# Altium PCB CH32M007E8R_FAN_R0.PcbDoc
Units mil, origin at the board's own origin, x right, y up, seen from the top; angles counter-clockwise.
Board outline 2118.97 x 1187.04 mil, 2 copper layers (Top Layer, Bottom Layer); 47 components, 34 nets, 143 pads, 76 vias.
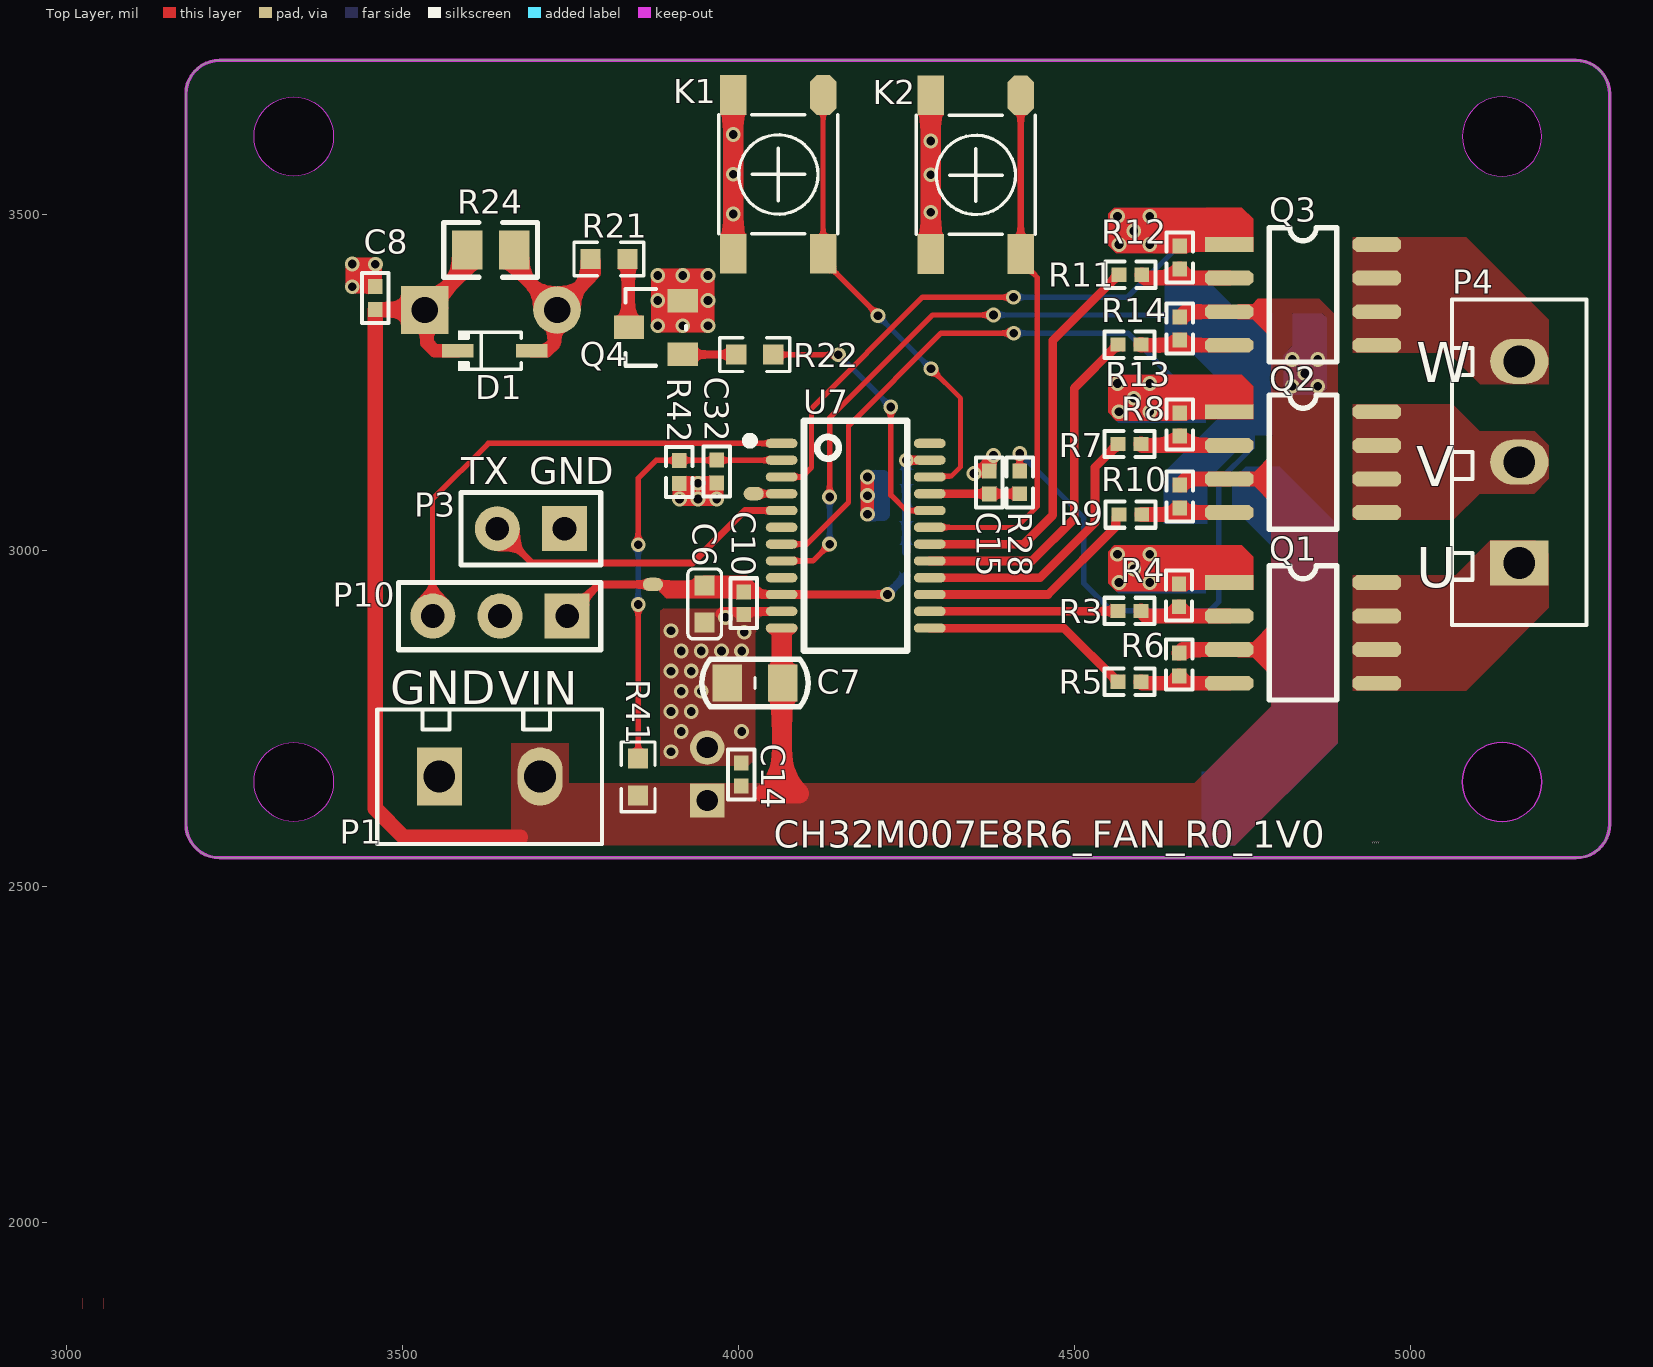
[diagram p0: Top Layer view]
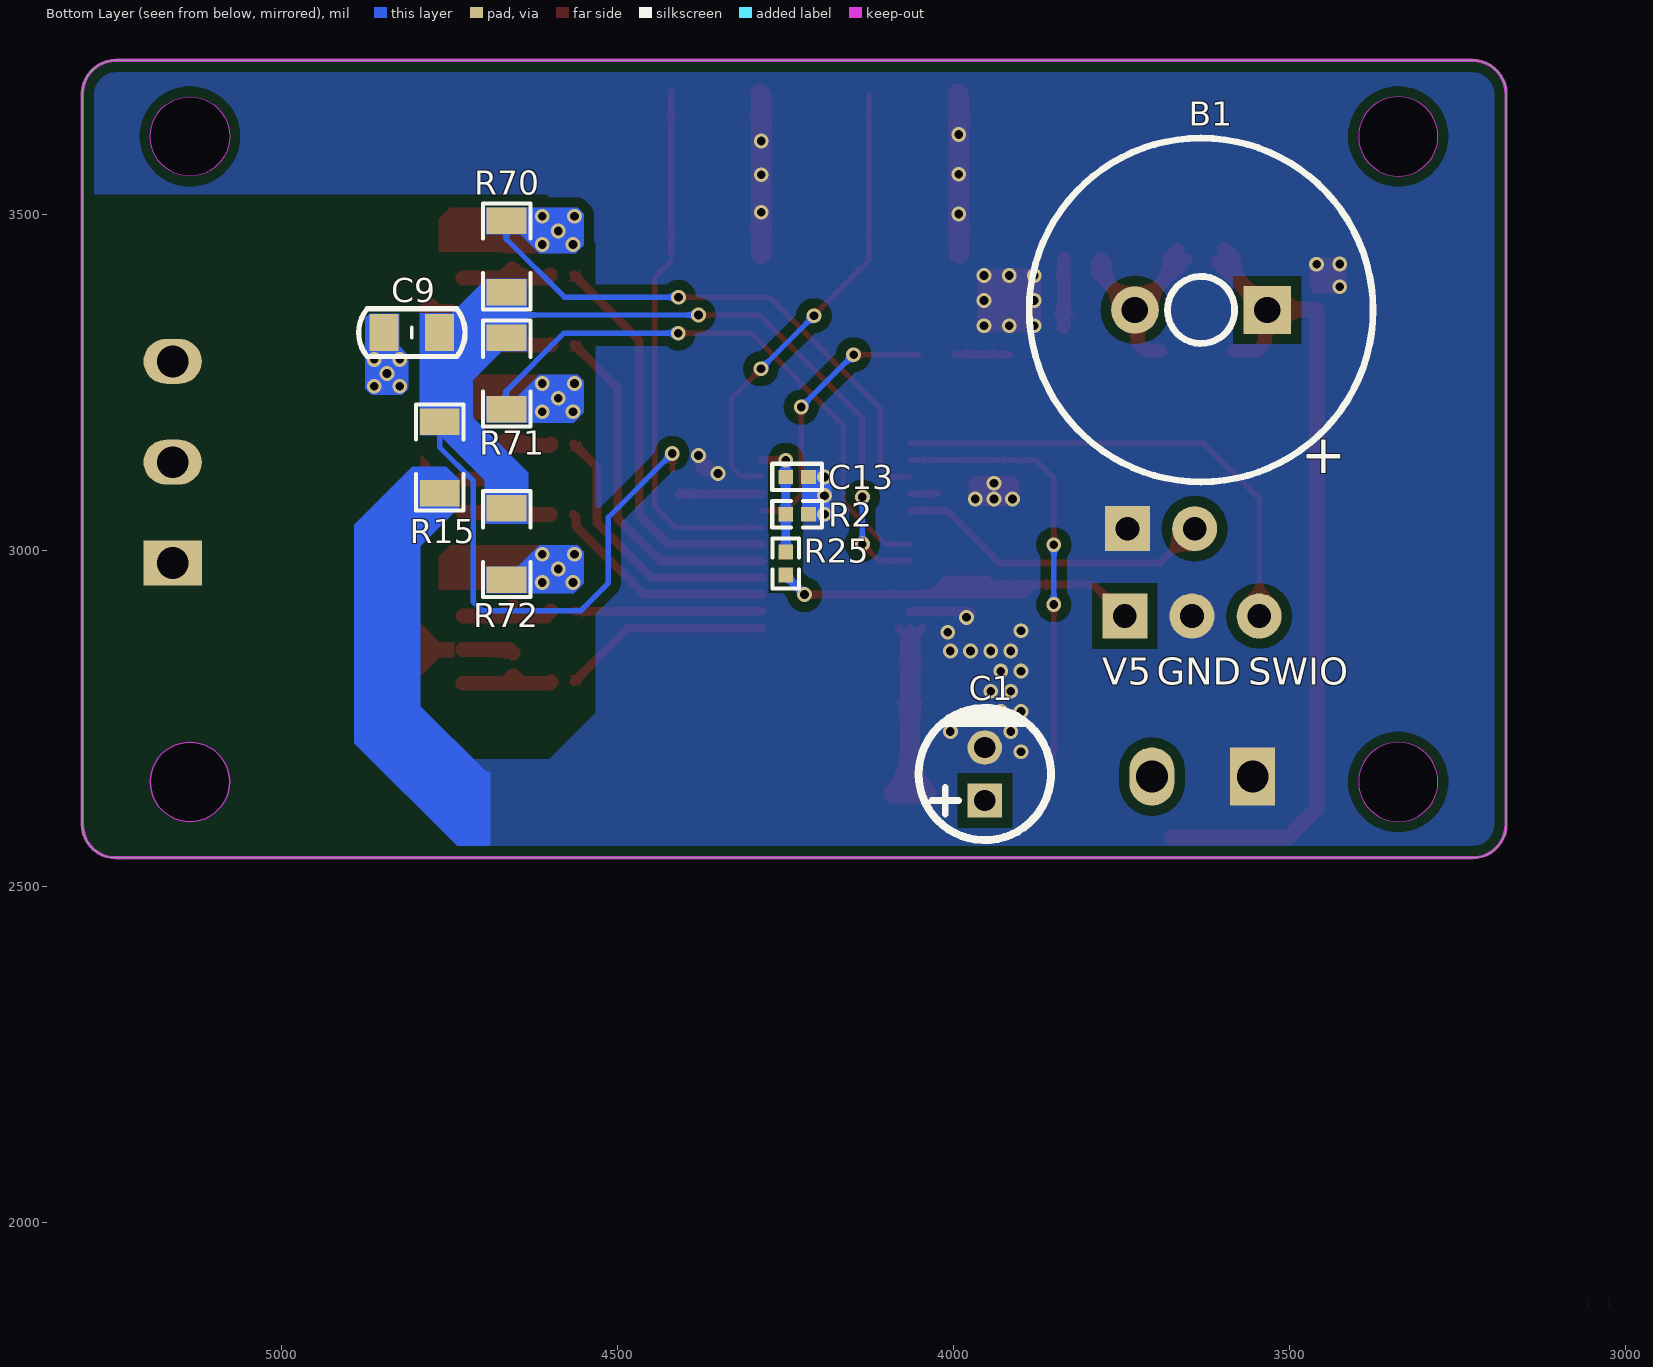
[diagram p1: Bottom Layer view, seen from below]

## Layer stack, top to bottom
Top Solder: solder mask 0.4, Solder Resist, Dk 3.5
Top Layer: signal copper 1.4
Dielectric1: dielectric 12.6, FR-4, Dk 4.8
Bottom Layer: signal copper 1.4
Bottom Solder: solder mask 0.4, Solder Resist, Dk 3.5

## Board outline
3177.96,2592 3177.96,3679.04 cw(c3227.96,3679.04) 3227.96,3729.04 5246.92,3729.04 cw(c5246.92,3679.04) 5296.92,3679.04 5296.92,2592 cw(c5246.92,2592) 5246.92,2542 3227.96,2542 cw(c3227.96,2592)
cut-out: 5077.81,2655.17 ccw(c5136.86,2655.17) 5136.86,2596.12 ccw(c5136.86,2655.17) 5195.92,2655.17 ccw(c5136.86,2655.17) 5136.86,2714.23 ccw(c5136.86,2655.17)
cut-out: 5077.81,3615.8 ccw(c5136.86,3615.8) 5136.86,3556.75 ccw(c5136.86,3615.8) 5195.92,3615.8 ccw(c5136.86,3615.8) 5136.86,3674.86 ccw(c5136.86,3615.8)
cut-out: 3338.44,2596.12 cw(c3338.44,2655.17) 3279.38,2655.17 cw(c3338.44,2655.17) 3338.44,2714.23 cw(c3338.44,2655.17) 3397.49,2655.17 cw(c3338.44,2655.17)
cut-out: 3338.44,3556.75 cw(c3338.44,3615.8) 3279.38,3615.8 cw(c3338.44,3615.8) 3338.44,3674.86 cw(c3338.44,3615.8) 3397.49,3615.8 cw(c3338.44,3615.8)

## Design rules (kind name [scope] priority, off if disabled: settings)
Clearance Clearance_1 [InPolygon] p1: gap=15 ignorepadtopadclearanceinfootprint=FALSE except(0: Arc-Hole Track-Hole SMDPad-Hole THPad-Hole Via-Hole Fill-Hole Poly-Hole Region-Hole Text-Hole)
Clearance [All] p2: gap=6 ignorepadtopadclearanceinfootprint=FALSE except(0: Arc-Hole Track-Hole SMDPad-Hole THPad-Hole Via-Hole Fill-Hole Poly-Hole Region-Hole Text-Hole)
DiffPairsRouting [All] p1: maxlimit=10 minlimit=10 mostfreqgap=10 toplayer_minwidth=15 toplayer_maxwidth=15 toplayer_prefwidth=15 bottomlayer_minwidth=15 bottomlayer_maxwidth=15 bottomlayer_prefwidth=15 substack1={CB62A223-23CE-4B5D-AA07-581922EC101A} toplayer_{cb62a223-23ce-4b5d-aa07-581922ec101a}_minwidth=15 toplayer_{cb62a223-23ce-4b5d-aa07-581922ec101a}_maxwidth=15 toplayer_{cb62a223-23ce-4b5d-aa07-581922ec101a}_prefwidth=15 bottomlayer_{cb62a223-23ce-4b5d-aa07-581922ec101a}_minwidth=15 bottomlayer_{cb62a223-23ce-4b5d-aa07-581922ec101a}_maxwidth=15 bottomlayer_{cb62a223-23ce-4b5d-aa07-581922ec101a}_prefwidth=15 substack2={A23039D2-CB89-402F-B5AE-C31389269607} toplayer_{a23039d2-cb89-402f-b5ae-c31389269607}_minwidth=15 toplayer_{a23039d2-cb89-402f-b5ae-c31389269607}_maxwidth=15 toplayer_{a23039d2-cb89-402f-b5ae-c31389269607}_prefwidth=15 bottomlayer_{a23039d2-cb89-402f-b5ae-c31389269607}_minwidth=15 bottomlayer_{a23039d2-cb89-402f-b5ae-c31389269607}_maxwidth=15 bottomlayer_{a23039d2-cb89-402f-b5ae-c31389269607}_prefwidth=15 substack3={24D51226-A82C-40CF-B0A6-47B6E82A89C6} toplayer_{24d51226-a82c-40cf-b0a6-47b6e82a89c6}_minwidth=15 toplayer_{24d51226-a82c-40cf-b0a6-47b6e82a89c6}_maxwidth=15 toplayer_{24d51226-a82c-40cf-b0a6-47b6e82a89c6}_prefwidth=15 bottomlayer_{24d51226-a82c-40cf-b0a6-47b6e82a89c6}_minwidth=15 bottomlayer_{24d51226-a82c-40cf-b0a6-47b6e82a89c6}_maxwidth=15 bottomlayer_{24d51226-a82c-40cf-b0a6-47b6e82a89c6}_prefwidth=15 maxuncoupledlength=500
PolygonConnect [All] p1: connectstyle=Direct reliefconductorwidth=10 reliefentries=4 polygonreliefangle="90 Angle" airgapwidth=10
RoutingVias [All] p1: holewidth=13 width=22 viastyle="Through Hole" minholewidth=13 minwidth=22 maxholewidth=28 maxwidth=50
SolderMaskExpansion [All] p1: expansion=4 istentingtop=FALSE
Width [All] p1: maxlimit=100 minlimit=6 preferedwidth=10 substack1={CB62A223-23CE-4B5D-AA07-581922EC101A} substack2={A23039D2-CB89-402F-B5AE-C31389269607} substack3={24D51226-A82C-40CF-B0A6-47B6E82A89C6} minimp=50.000000 maximp=50.000000 favimp=50.000000
29 further rules are at their usual default settings.

## Components (designator, comment, footprint, x,y, rotation, side; value= is the part's Value field where it differs from the comment)
B1 "BUZZER" M_BUZZER12550 3630.93,3358.42 r0 bottom
C1 "47uF/35V" M_C_RB_D5F2 3952,2667 r90 bottom
C6 "10uF" M_C0603 3952,2920 r270 top
C7 "10uF/25V" M_C0805 4028,2803 r180 top
C8 "0.1uF/25V" M_C0402- 3459.52,3376 r90 top
C9 "1uF/50V" M_C0805 4809.52,3323 r180 bottom
C10 "0.1uF" M_C0402- 4008.37,2920.22 r270 top
C13 "0.1uF" M_C0402- 4232.14,3109.37 r180 bottom
C14 "0.1uF/50V" M_C0402- 4004,2667 r90 top
C15 "1nF" M_C0402- 4373.95,3100.11 r270 top
C32 "0.1uF" M_C0402- 3968.37,3116.14 r270 top
D1 "4148" SOD-323 3637.52,3297 r180 top
K1 "KH-6X6X8H-STM" KEY2-SMD 4057.54,3558.59 r270 top
K2 "KH-6X6X8H-STM" KEY2-SMD 4351.48,3558 r270 top
P1 "POWER" WJ15EDGRC3.81-2 3630,2658 r0 top
P3 "TXD" HDR2.54-LI-2P 3741.39,3032 r270 top
P4 "MHDR1X3" WJ15EDGRC3.81-3 5162.52,3131 r90 top
P10 "SWD" HDR2.54-LI-3P 3595.39,2902 r270 top
Q1 "NP4606SR" SOP8 4730.52,2952 r270 top
Q2 "NP4606SR" SOP8 4730.52,3206 r270 top
Q3 "NP4606SR" SOP8 4730.52,3455 r270 top
Q4 "S8050" SOT23 3877.52,3331.48 r90 top
R2 "1k 1%" M_R0402- 4233.78,3052 r0 bottom
R3 "22 Ω" M_R0402- 4581.22,2908.2 r180 top
R4 "20k" M_R0402- 4657.28,2932 r270 top
R5 "22 Ω" M_R0402- 4581.65,2802.63 r180 top
R6 "20k" M_R0402- 4657.52,2829 r270 top
R7 "22 Ω" M_R0402- 4581.65,3156.63 r180 top
R8 "20k" M_R0402- 4658.52,3186 r270 top
R9 "22 Ω" M_R0402- 4582.65,3051.63 r180 top
R10 "20k" M_R0402- 4658.52,3079 r270 top
R11 "22 Ω" M_R0402- 4582.65,3408.63 r180 top
R12 "20k" M_R0402- 4658.52,3435 r270 top
R13 "22 Ω" M_R0402- 4581.65,3304.63 r180 top
R14 "20k" M_R0402- 4658.52,3329 r270 top
R15 "0R100/1W" M_R1206- 4766,3136.85 r90 bottom
R21 "100Ω" M_R0603 3834.52,3434.5 r180 top
R22 "1kΩ" M_R0603 3997.5,3290 r0 top
R24 "2KΩ" M_R0805 3664.52,3447 r180 top
R25 "15k 1%" M_R0402- 4248.63,2979.14 r270 bottom
R28 "10k" M_R0402- 4420.19,3100.18 r270 top
R41 "4.7k 1%" M_R0603 3850,2689.5 r270 top
R42 "1k 1%" M_R0402- 3910.89,3117.43 r90 top
R70 "0R100/1W" M_R1206- 4666.52,3436 r90 bottom
R71 "0R100/1W" M_R1206- 4664.52,3264 r270 bottom
R72 "0R100/1W" M_R1206- 4664.52,3010.3 r270 bottom
U7 "CH32M007E8R6" QSOP24 4064.53,3159 r270 top locked

## Footprints (in the part's own frame and the unit in brackets; to place one, negate y for a bottom-side part, rotate by r counter-clockwise, add the part's x,y. Pads: shape width x height; smd on the part's side, far side on the other; paste and mask are expansions set on the pad)
HDR2.54-LI-2P [mm]
  rect 1.7x1.7 hole 0.9: 1(0,0)
  round 1.7 hole 0.9: 2(0,-2.54)
  silkscreen extent -1.37,-3.91 1.37,1.37, body extent -1.27,-3.81 1.27,1.27, height 8.5
HDR2.54-LI-3P [mm]
  rect 1.7x1.7 hole 0.9: 1(0,3.81)
  round 1.7 hole 0.9: 2(0,1.27) 3(0,-1.27)
  silkscreen extent -1.27,-2.57 1.27,5.08, body extent -1.27,-2.54 1.27,5.08, height 8.5
KEY2-SMD [mm]
  oct 1.5x1 smd: 1(-3.023,1.749)
  rect 1.5x1 smd: 2(2.977,1.749) 3(-3.023,-1.651) 4(2.977,-1.651)
  silkscreen extent -2.27,-2.2 2.23,2.3, body extent -3.21,-2.55 3.19,2.65, height 1.5
M_BUZZER12550 [mm]
  rect 1.8x1.8 hole 1: 1(-2.477,0.023)
  round 1.8 hole 1: 2(2.523,0.023)
  silkscreen extent -6.48,-6.48 6.52,6.52
M_C0402- [mm]
  rect 0.566x0.54 smd mask+0.051: 1(-0.454,-0.009) 2(0.412,-0.009)
  silkscreen extent -0.97,-0.51 0.92,0.49
M_C0603 [mil]
  rect 30x30 smd: 1(-27.5,-2) 2(27.5,-2)
  silkscreen extent -52,-27 52,23
M_C0805 [mm]
  rect 1.1x1.4 smd: 1(-0.972,0.019) 2(1.128,0.019)
  silkscreen extent -1.93,-0.88 2.09,0.92
M_C_RB_D5F2 [mm]
  rect 1.3x1.3 hole 0.8: 1(-1.005,0.045)
  round 1.3 hole 0.8: 2(0.995,0.045)
  silkscreen extent -2.5,-2.45 2.49,2.55
M_R0402- [mm]
  rect 0.566x0.54 smd mask+0.051: 1(-0.454,-0.035) 2(0.412,-0.035)
  silkscreen extent -0.97,-0.53 0.92,0.46
M_R0603 [mil]
  rect 30x30 smd: 1(-0.5,1) 2(54.5,1)
  silkscreen extent -25,-24 79,26
M_R0805 [mm]
  rect 1.16x1.47 smd: 1(-0.051,0) 2(1.729,0)
  silkscreen extent -0.93,-1.04 2.61,1.03
M_R1206- [mm]
  rect 1x1.5 smd: 1(-1.325,-0.025) 2(1.375,-0.025)
  silkscreen extent -1.97,-0.93 2.03,0.87
QSOP24 [mm]
  oval 0.35x1.2 smd mask+0.051: 1(0,0) 2(0.635,0) 3(1.27,0) 4(1.905,0) 5(2.54,0) 6(3.175,0) 7(3.81,0) 8(4.445,0) 9(5.08,0) 10(5.715,0) 11(6.35,0) 12(6.985,0) 13(6.985,5.6) 14(6.35,5.6) 15(5.715,5.6) 16(5.08,5.6) 17(4.445,5.6) 18(3.81,5.6) 19(3.175,5.6) 20(2.54,5.6) 21(1.905,5.6) 22(1.27,5.6) 23(0.635,5.6) 24(0,5.6)
  silkscreen extent -0.86,-1.35 7.84,4.75
SOD-323 [mil]
  rect 47.24x20 smd: 1(-55,0) 2(55,0)
  silkscreen extent -39,-30 55,30
SOP8 [mil]
  rect 22x72 smd: 1(0,0)
  oct 22x72 smd: 2(50,0) 3(100,0) 4(150,0) 5(150,220) 6(100,220) 7(50,220) 8(0,220)
  silkscreen extent -25,60 175,160, body extent -24,-8 174,230, height 63
SOT23 [mil]
  rect 35x45 smd: 1(-40,-40) 2(40,-40) 3(0,40)
  silkscreen extent -57,-45 57,45
WJ15EDGRC3.81-2 [mm]
  rect 1.7x2.2 hole 1.2: 1(-1.905,0.127)
  oval 1.7x2.2 hole 1.2: 2(1.905,0.127)
  silkscreen extent -4.25,-2.41 4.25,2.67
WJ15EDGRC3.81-3 [mm]
  rect 1.7x2.2 hole 1.2: 1(-3.81,0)
  oval 1.7x2.2 hole 1.2: 2(0,0) 3(3.81,0)
  silkscreen extent -6.15,-2.54 6.15,2.54

## Part data
C1: library part "CAPACITOR POL_2", "Capacitor"
C6 C7 C8 C9 C10 C13 C14 C15 C32: library part "Cap Semi", "Capacitor (Semiconductor SIM Model)", LatestRevisionDate=17-Jul-2002, LatestRevisionNote="Re-released for DXP Platform.", PackageReference=C0805, Published=8-Jun-2000, Publisher="Altium Limited"
D1: library part "Diode 1N4148", "High Conductance Fast Diode", Code_JEDEC=DO-204-AH, ComponentLink1Description="Manufacturer Link", ComponentLink1URL=http://www.fairchildsemi.com/, ComponentLink2Description=Datasheet, ComponentLink2URL=http://www.fairchildsemi.com/ds/1N%2F1N4148.pdf, DatasheetDocument=1997, LatestRevisionDate=17-Jul-2002, LatestRevisionNote="Re-released for DXP Platform.", PackageReference=DO-35, Published=8-Jun-2000, Publisher="Altium Limited"
K1 K2: Contact Current=50mA, IP Rating=-, JLCPCB Part Class="Extended Part", Voltage Rating (DC)=12V, Add into BOM=yes, Convert to PCB=yes, Datasheet=https://atta.szlcsc.com/upload/public/pdf/source/20210608/C2837534_94EAC7D8AFBB996E2814FACF50FEEF85.pdf, Device=KH-6X6X8H-STM, LCSC Part Name=KH-6X6X8H-STM, Manufacturer Part=KH-6X6X8H-STM, Mechanical Life=80000, Name==''Part, Operating Force=-, Operating Temperature=-, Power Rating=-, Supplier=LCSC, Supplier Footprint=SMD, Supplier Part=C2837534, Switch Height=-, Switch Length=6mm, Switch Width=6mm, Symbol=KH-6X6X8H-STM, Voltage Rating (AC)=-, With Lamp=-
P1 P3: library part 2PIN
P4: "Header, 3-Pin", LatestRevisionDate=17-Jul-2002, LatestRevisionNote="Re-released for DXP Platform.", Publisher="Altium Limited"
P10: library part 3PIN
Q1 Q2 Q3: library part NP9926BSR-G, Continuous Drain Current (Id)=6A, Drain Source Voltage (Vdss)=20V, Gate Threshold Voltage (Vgs(th)@Id)=700mV@250uA, Input Capacitance (Ciss@Vds)=900pF@10V, JLCPCB Part Class="Extended Part", Power Dissipation (Pd)=1.25W, Reverse Transfer Capacitance (Crss@Vds)=100pF@10V, Add into BOM=yes, Convert to PCB=yes, Datasheet=https://atta.szlcsc.com/upload/public/pdf/source/20220426/45EDAE8AA532D945771DBC41E7CE2370.pdf, Device=NP9926BSR-G, Manufacturer Part=NP9926BSR-G, Supplier=LCSC, Supplier Footprint=SOP-8, Supplier Part=C2991134, Symbol=NP9926BSR-G, Total Gate Charge (Qg@Vgs)=12nC@4.5V
Q4: library part NPN1
R2 R3 R4 R5 R6 R7 R8 R9 R10 R11 R12 R13 R14 R15 R21 R22 R24 R25 R28 R41 R42 R70 R71 R72: library part Res2, "Resistor", LatestRevisionDate=17-Jul-2002, LatestRevisionNote="Re-released for DXP Platform.", PackageReference=AXIAL-0.4, Published=8-Jun-2000, Publisher="Altium Limited"
U7: "RISC-V MCU, 48MHz, OPA/CMP/UART/I2C, 24V P/NMOS gate driver for motor"

## Free pads (board coordinates)
  oval 30x20 smd: 2(3873,2949) 2(4023,3084)

## Via types
v1: diameter 22, hole 13, Top Layer to Bottom Layer, tented both sides, 76 vias

## Nets (pads, with @x,y where several pads share a name; then routed paths per layer and width w, separated by ;. In a path a pad name is that pad's centre, name@x,y a point inside that pad or via, vN(x,y) a via of type N, cw(c..) or ccw(c..) an arc to the next point about the centre after c; other vN are vias at no path point)
ADC_Vbus: C32.1 R41.1 R42.2 U7.2 | length 641.7
  Top Layer w8: R41.1 v1(3851,2919) ; v1(3851,3008) 3851,3107 3877.65,3133.65 R42.2 3912.43,3133.82 4064.35,3133.82 U7.2
  Bottom Layer w8: v1(3851,2919) v1(3851,3008)
BEEP_CTRL: R22.2 U7.20 | length 405.8
  Top Layer w8: R22.2 v1(4149,3291) ; v1(4227,3213) 4227,3082 4250,3059 U7.20
  Bottom Layer w8: v1(4149,3291) v1(4227,3213)
CMP1_N0: C15.2 R28.2 U7.21 | length 123.7
  Top Layer w13: U7.21 4285.11,3083.89 4352.63,3083.89 4408.52,3083.89 R28.2@4408.63,3083.78
CMP1_P0: C13.1 R2.2 R25.1 U7.23 | length 172
  Top Layer w13: v1(4250,3133.85) 4284.85,3133.85 U7.23
  Bottom Layer w13: v1@4249.93,3133.93 v1(4250,3133.85) C13.1 R2.2 R25.1
GND: C1.2 C6.2 C7.2 C8.2 C10.2 C13.2 C14.2 C15.1 C32.2 K1.3 K1.4 K2.3 K2.4 P1.1 P3.1 P10.2 Q4.2 R2.1 R15.1 R42.1 U7.11 | length 1955.3
  Top Layer w13: v1@3972.63,2904.78 v1@3972.63,2904.87 ; v1@3972.63,2905.78 3975.7,2908.85 4064.38,2908.85 U7.11 ; v1@4353.72,3115.72 4379,3141 v1(4380,3141) 4380,3138.56 4377.76,3136.32 4377.76,3121.99 4371.49,3115.72 v1@4353.72,3115.72 ; v1@4353.72,3115.72 4352,3114 v1(4351,3114) 4352.72,3115.72 v1@4353.72,3115.72
  Top Layer w20: 3425.55,3409 3459.85,3408.92 ; R42.1 R42.1@3912.43,3099.74 ; C32.2 C32.2@3967.82,3099.74 ; v1(4192.29,3053.37) v1(4192.29,3081.18) v1(4192.29,3109) ; v1(3880.03,3371.48) v1(3880.03,3408.97) 3898.77,3408.97 ; v1(3880.03,3371.48) v1(3880.03,3334) 3898.77,3334 ; v1(3880.03,3371.48) Q4.2@3898.77,3371.48 ; 3898.77,3334 Q4.2@3898.77,3371.48 ; 3898.77,3334 v1(3917.52,3334) ; Q4.2@3898.77,3371.48 3898.77,3408.97 ; Q4.2@3898.77,3371.48 Q4.2 ; 3898.77,3408.97 v1(3917.52,3408.97) ; 3912.43,3087.93 3940.13,3087.93 ; 3912.43,3087.93 R42.1@3912.43,3099.74 ; 3912.43,3087.93 v1(3912.43,3076.11) v1(3940.13,3076.11) ; R42.1@3912.43,3099.74 v1(3940.13,3099.74) ; v1(3917.52,3334) Q4.2 ; v1(3917.52,3334) 3936.26,3334 ; Q4.2 v1(3917.52,3408.97) ; Q4.2 Q4.2@3936.26,3371.48 ; v1(3917.52,3408.97) 3936.26,3408.97 ; 3936.26,3334 Q4.2@3936.26,3371.48 ; 3936.26,3334 v1(3955,3334) v1(3955,3371.48) ; Q4.2@3936.26,3371.48 3936.26,3408.97 ; Q4.2@3936.26,3371.48 v1(3955,3371.48) ; 3936.26,3408.97 v1(3955,3408.97) v1(3955,3371.48) ; v1(3940.13,3076.11) v1(3967.82,3076.11) 3967.82,3087.93 ; v1(3940.13,3076.11) 3940.13,3087.93 ; 3940.13,3087.93 3967.82,3087.93 ; 3940.13,3087.93 v1(3940.13,3099.74) ; v1(3940.13,3099.74) C32.2@3967.82,3099.74 ; 3967.82,3087.93 C32.2@3967.82,3099.74 ; v1(3425.52,3392) C8.2 3459.89,3408.92 v1(3459.89,3425.63) v1(3425.52,3426) 3425.52,3409 v1(3425.52,3392)
  Top Layer w30: K1.4 v1(3992.56,3500.42) v1(3992.56,3559.48) v1(3992.56,3618.53) K1.3 K1.3@3994.54,3679.57 ; K2.4 v1(4286.5,3558.89) K2.3 K2.3@4288.48,3678.98
  Bottom Layer w20: 4192.29,3067.28 4215.92,3067.28 ; 4192.29,3067.28 v1(4192.29,3053.37) R2.1 4215.92,3067.28 ; 4192.29,3067.28 v1(4192.29,3081.18) ; v1(4192.29,3081.18) 4192.29,3095.09 ; v1(4192.29,3081.18) 4215.92,3081.18 ; 4192.29,3095.09 4214.01,3095.09 4215.92,3097 ; 4192.29,3095.09 v1(4192.29,3109) C13.2 4215.92,3097 ; 4215.92,3067.28 4215.92,3081.18 ; 4215.92,3081.18 4215.92,3097
  other v1: 3900,2700 3915,2730 4005,2730 3900,2760 3930,2760 3915,2790 3945,2790 3900,2820 3930,2820 3915,2850 3945,2850 3975,2850 4005,2850 4009,2878 3900,2880 3981,2900 4286.48,3503 4286.48,3609
I1_shunt: C9.2 R15.2 R28.1 R70.1 R71.1 R72.1 U7.8 | length 1700.6
  Top Layer w8: U7.8 4111,2984 v1(4136,3009) ; v1(4136,3079) 4136,3197 4289,3350 v1(4380,3350) ; R28.1 v1@4418.81,3143.82
  Bottom Layer w8: v1(4136,3009) v1(4136,3079) ; v1(4380,3350) 4665.52,3350 ; v1(4419,3144) 4514,3049 4514,2951 4555,2910 4702,2910 4715,2923 4715,3103 4765,3153 R15.2
  Bottom Layer w30: R71.1 4665.52,3350 R70.1
KEY1: K1.1 K1.2 U7.22 | length 690.5
  Top Layer w7.5: K1.1 K1.2 4126.42,3431.52 4142.35,3415.59 4208,3349.94 v1(4208,3349) ; U7.22 4286.2,3110.2 4317.2,3110.2 4331,3124 4331,3226 v1(4287,3270)
  Bottom Layer w7.5: v1(4208,3349) v1(4287,3270)
KEY2: K2.1 K2.2 U7.19 | length 794.4
  Top Layer w7.5: U7.19 4414,3034 4445,3065 4445,3406 K2.2@4421,3430 ; K2.1 K2.1@4420.36,3687.36
  Top Layer w10: K2.2 K2.1
M1_CH1_H: R5.2 U7.13 | length 313.6
  Top Layer w13: U7.13 4484.93,2884 4564.93,2804 R5.2
M1_CH1_L: R3.2 U7.14 | length 280.8
  Top Layer w13: U7.14 4285.15,2909.15 4564.58,2909.15 R3.2@4565.44,2910
M1_CH2_H: R9.2 U7.15 | length 339
  Top Layer w13: U7.15 4461,2934 4561.8,3034.8 4561.8,3048.87 4565.93,3053 R9.2
M1_CH2_L: R7.2 U7.16 | length 411.2
  Top Layer w13: U7.16 4449,2959 4531,3041 4531,3123.56 R7.2
M1_CH3_H: R13.2 U7.17 | length 527.5
  Top Layer w13: U7.17 4437,2984 4500,3047 4500,3241.07 4564.93,3306 R13.2
M1_CH3_L: R11.2 U7.18 | length 599.9
  Top Layer w13: U7.18 4425,3009 4468,3052 4468,3312.07 4565.93,3410 R11.2
M1_Iu: Q1.1 R4.1 R72.2 | length 75.8
  Top Layer w20: R4.1 4655.91,2950.37 4657.54,2952 Q1.1
  other v1: 4566.52,2952 4612.52,2952 4588.52,2972 4564.52,2994 4612.52,2994
M1_Iv: Q2.1 R8.1 R71.2 U7.7 | length 935.6
  Top Layer w8: U7.7 4102,3009 4164,3071 4164,3185 4302,3323 v1(4410,3323)
  Top Layer w22: R8.1 4657.38,3203.86 4659.52,3206 Q2.1
  Bottom Layer w8: v1(4410,3323) 4580,3323 4666.52,3236.48 R71.2@4666.52,3209.85
  other v1: 4566.52,3206 4612.52,3206 4588.52,3226 4564.52,3248 4612.52,3248
M1_Iw: Q3.1 R12.1 R70.2 U7.3 | length 949.3
  Top Layer w8: U7.3 4095,3109 4109,3123 4109,3211 4274.5,3376.5 v1(4409.66,3376.5)
  Top Layer w22: R12.1 4657.38,3452.86 4659.52,3455 Q3.1
  Bottom Layer w8: v1(4409.66,3376.5) 4579.5,3376.5 4666.02,3463.02 R70.2@4666.02,3489.65 ; R70.2@4650.37,3475 R70.2 R70.2@4666.02,3489.65 ; R70.2@4686.52,3475 4680.66,3475 R70.2@4666.02,3489.65
  other v1: 4566.52,3455 4612.52,3455 4588.52,3475 4564.52,3497 4612.52,3497
M1_U: P4.1 Q1.5 Q1.6 Q1.7 Q1.8
M1_V: P4.2 Q2.5 Q2.6 Q2.7 Q2.8
M1_W: P4.3 Q3.5 Q3.6 Q3.7 Q3.8
NetB1_2: B1.2 D1.1 R21.2 R24.1 | length 375
  Top Layer w20: R24.1@3654.52,3433.26 3679.35,3408.43 ; R24.1 3679.35,3434.17 3679.35,3408.43 ; D1.1 3714.81,3297 3726.53,3308.72 3726.53,3353.76 B1.2 ; 3679.35,3408.43 B1.2 ; B1.2 3775.52,3402.75 ; 3775.52,3402.75 3785.52,3412.75 3785.52,3429 3780.52,3434 3775.52,3429 3775.52,3402.75
NetQ1_2: Q1.2 R3.1 R4.2 | length 190.1
  Top Layer w22: R3.1@4599.52,2910 4599.52,2909.76 4607.28,2902 4642.13,2902 ; 4686.32,2902 4670.17,2902 ; Q1.2 4670.17,2902 ; 4642.13,2902 4670.17,2902 ; 4642.13,2902 R4.2 4656.15,2915.78 4656.38,2915.78 4670.17,2902
NetQ1_4: Q1.4 R5.1 R6.2 | length 167.3
  Top Layer w22: R5.1 4599.52,2803.76 4601.28,2802 4645.13,2802 ; 4671.52,2802 4667.17,2802 ; Q1.4 4667.17,2802 ; 4645.13,2802 4655.91,2812.78 R6.2 4656.38,2812.78 4667.17,2802 ; 4645.13,2802 4667.17,2802
NetQ2_2: Q2.2 R7.1 R8.2 | length 187.1
  Top Layer w22: R7.1 4599.52,3157.76 4601.28,3156 4643.13,3156 ; 4686.82,3156 4671.17,3156 ; Q2.2 4671.17,3156 ; 4643.13,3156 4671.17,3156 ; 4643.13,3156 4656.91,3169.78 R8.2 4657.38,3169.78 4671.17,3156
NetQ2_4: Q2.4 R9.1 R10.2 | length 164.5
  Top Layer w22: R9.1 R10.2@4647.13,3053 ; 4673.52,3056 R10.2@4664.17,3056 ; Q2.4 R10.2@4664.17,3056 ; R10.2@4647.13,3053 4651.58,3053 4654.58,3056 R10.2@4664.17,3056 ; R10.2@4647.13,3053 4656.91,3062.78 R10.2 4657.38,3062.78 R10.2@4664.17,3056
NetQ3_2: Q3.2 R11.1 R12.2 | length 187.3
  Top Layer w22: R11.1 4600.52,3409.76 4605.28,3405 4643.13,3405 ; 4686.82,3405 4671.17,3405 ; Q3.2 4671.17,3405 ; 4643.13,3405 4656.91,3418.78 R12.2 4657.38,3418.78 4671.17,3405 ; 4643.13,3405 4671.17,3405
NetQ3_4: Q3.4 R13.1 R14.2 | length 162.4
  Top Layer w22: R13.1 4599.52,3305.76 4600.28,3305 R14.2@4649.13,3305 ; 4673.52,3305 R14.2@4665.17,3305 ; Q3.4 R14.2@4665.17,3305 ; R14.2@4649.13,3305 4656.91,3312.78 R14.2 4657.38,3312.78 R14.2@4665.17,3305 ; R14.2@4649.13,3305 R14.2@4665.17,3305
NetQ4_1: Q4.1 R22.1 | length 80
  Top Layer w12: Q4.1 Q4.1@3917.76,3291.24 ; Q4.1@3918,3291 Q4.1@3917.76,3291.24 ; R22.1 3996.76,3291.24 Q4.1@3917.76,3291.24
NetQ4_3: Q4.3 R21.1 | length 104.1
  Top Layer w20: R21.1 3836.27,3432.25 3836.27,3332.73 Q4.3@3837.02,3331.98 ; R21.1@3835.52,3434 R21.1@3836.02,3433.5 ; Q4.3@3836.77,3331.73 Q4.3@3837.02,3331.98 ; Q4.3 Q4.3@3837.02,3331.98
SWIO: P10.3 U7.1 | length 728.1
  Top Layer w8: P10.3 3545,2902.39 3545,3076 3628,3159 U7.1
TP1: pad.2@4023,3084 U7.4 | length 41.5
  Top Layer w10: pad.2@4023,3084 U7.4
UART1_TX: P3.2 U7.5 | length 476.6
  Top Layer w10: P3.2 3642,3032 3693,2981 3932,2981 4010,3059 U7.5
V5: C6.1 C10.1 P10.1 pad.2@3873,2949 R25.2 U7.10 | length 838
  Top Layer w12: P10.1 3792.39,2949 3873,2949 pad.2@3880,2949 ; 3915.55,2941.18 3915.23,2941.5 ; C6.1 C10.1@4015.26,2947.5 ; 3972.63,2934 3922.73,2934 ; 3977.99,2934 C10.1@4003,2934 ; 3993,2944 C10.1@4003,2934 ; C10.1@4017.76,2944 4023.76,2944 ; v1(4222,2934) U7.10 4033.76,2934 ; pad.2@3880,2949 3887.5,2941.5 ; pad.2@3880,2949 3907.73,2949 ; 3887.5,2941.5 3895,2934 3922.73,2934 ; 3887.5,2941.5 3915.23,2941.5 ; 3907.73,2949 3915.23,2941.5 ; 3907.73,2949 3942.46,2949 3949.46,2956 4011.76,2956 4023.76,2944 ; 3915.23,2941.5 3922.73,2934 ; C10.1@4003,2934 4033.76,2934 ; 4023.76,2944 4033.76,2934
  Bottom Layer w12: v1(4222,2934) 4222,2934.41 4250,2962.41 R25.2
Vin: B1.1 C1.1 C7.1 C8.1 C9.1 C14.1 D1.2 P1.2 Q1.3 Q2.3 Q3.3 R6.1 R10.1 R14.1 R24.2 R41.2 U7.12 | length 2309.5
  Top Layer w13: U7.12@4047.62,2883.62 4056.12,2875.12 ; U7.12 4064.62,2883.91 4064.62,2866.62 ; U7.12@4082,2884 4073.31,2875.31 ; 4056.12,2875.12 4056.12,2738.88 4064.62,2730.38 ; 4056.12,2875.12 4064.62,2866.62 ; 4064.62,2730.38 4064.62,2798.5 4064.62,2866.62 ; 4064.62,2730.38 4065,2730 4073.31,2738.31 4073.31,2875.31 ; 4064.62,2866.62 4073.31,2875.31
  Top Layer w20: B1.1 3536.52,3354.41 3536.52,3309 3548.52,3297 D1.2
  Top Layer w22: R6.1 4656.38,2846.86 4661.52,2852 Q1.3 ; R10.1 4657.38,3096.86 4666.52,3106 Q2.3 ; R14.1 4657.38,3346.86 4665.52,3355 Q3.3
  Top Layer w23: R24.2 3585.1,3435.67 3585.1,3409.19 ; R24.2@3605.52,3429.6 3585.1,3409.19 ; 3675.33,2573 3502,2573 3459.89,2615.11 C8.1 3526.79,3358.14 3529.79,3361.14 B1.1 3585.1,3409.19
  Top Layer w30: C7.1@4064.62,2798.5 4065,2798.12 4065,2730 4065,2663.22 ; 4065.19,2638.03 4090.19,2638.03 4065,2663.22 ; 4065,2663.22 4040,2638.22 4040,2638 4065,2638 4065,2663.22
  other v1: 4824.52,3244 4862.52,3244 4843.52,3263 4824.52,3284 4862.52,3284
pads on no net: U7.6 U7.9 U7.24

## Polygon pours and split planes (outlines as drawn)
Vin on Top Layer "NONET_L-01_P-001" (solid, pour order 0): 3662,2713 3748,2713 3748,2653 4679,2653 4793.48,2767.48 4793.54,3374.03 4864.49,3374.03 4892,3346.51 4892,2713 4740.03,2561.03 3662,2561.03
M1_V on Top Layer "NONET_L-01_P-001" (solid, pour order 1): 4914.52,3217 5063.51,3217 5103.51,3177 5185.52,3177 5206.52,3156 5206.52,3106 5184.51,3084 5103.51,3084 5064.51,3045 4914.52,3045
M1_W on Top Layer "NONET_L-01_P-001" (solid, pour order 2): 5206.52,3247 5206.52,3343 5083.52,3466 4914.52,3466 4914.52,3294 5057.52,3294 5104.51,3247
M1_U on Top Layer "NONET_L-01_P-001" (solid, pour order 3): 5119.51,3015 5186.52,3015 5206.52,2995 5206.52,2914 5083.52,2791 4914.52,2791 4914.52,2963 5067.52,2963
GND on Top Layer "GND_L01_P011" (solid, pour order 11): 3884,2916 3884,2679 4015,2679 4025,2689 4025,2877 4044,2896 4088,2896 4088,2916
GND on Bottom Layer "NONET_L-01_P-001" (solid, remove dead copper, pour order 4): 4723,2689 4602,2689 4533,2758 4533,3457 4606,3530 5296.94,3530 5296.94,3729.04 3177.96,3729.04 3177.96,2541.51 4462.52,2541 4695,2541 4723,2569

## Keep-outs
Keep-Out Layer:
  pour cut-out: 5136.86,2596.12 cw(c5136.86,2655.17) 5077.81,2655.17 cw(c5136.86,2655.17) 5136.86,2714.23 cw(c5136.86,2655.17) 5195.92,2655.17 cw(c5136.86,2655.17)
  pour cut-out: 3338.44,2596.12 cw(c3338.44,2655.17) 3279.38,2655.17 cw(c3338.44,2655.17) 3338.44,2714.23 cw(c3338.44,2655.17) 3397.49,2655.17 cw(c3338.44,2655.17)
  pour cut-out: 3338.44,2596.12 cw(c3338.44,2655.17) 3279.38,2655.17 cw(c3338.44,2655.17) 3338.44,2714.23 cw(c3338.44,2655.17) 3397.49,2655.17 cw(c3338.44,2655.17)
  pour cut-out: 5077.81,3615.8 ccw(c5136.86,3615.8) 5136.86,3556.75 ccw(c5136.86,3615.8) 5195.92,3615.8 ccw(c5136.86,3615.8) 5136.86,3674.86 ccw(c5136.86,3615.8)
  pour cut-out: 3338.44,3556.75 cw(c3338.44,3615.8) 3279.38,3615.8 cw(c3338.44,3615.8) 3338.44,3674.86 cw(c3338.44,3615.8) 3397.49,3615.8 cw(c3338.44,3615.8)
  lines w5: 3177.96,2592 ccw(c3227.96,2592) 3227.96,2542 5246.92,2542 ccw(c5246.92,2592) 5296.92,2592 5296.92,3679.04 ccw(c5246.92,3679.04) 5246.92,3729.04 3227.96,3729.04 ccw(c3227.96,3679.04) 3177.96,3679.04 3177.96,2592

## Other copper
Top Layer:
  region net Vin: 4743.52,2863 4765.52,2863 4793.52,2891 4793.52,2813 4765.52,2841 4743.52,2841
  region net Vin: 4746.52,3117 4768.52,3117 4793.51,3142 4793.52,3070 4768.52,3095 4746.52,3095
  region net M1_Iw: 4562.52,3442 4550.52,3454 4550.52,3501 4559.52,3510 4749.52,3510 4766.52,3493 4766.52,3444 4669.52,3444 4667.52,3442
  region net M1_Iv: 4562.52,3193 4550.52,3205 4550.52,3252 4559.52,3261 4749.52,3261 4766.52,3244 4766.52,3195 4669.52,3195 4667.52,3193
  region net Vin: 4743.52,3366 4765.52,3366 4773.51,3374 4794,3374 4794,3315.51 4765.52,3344 4743.52,3344
  region net M1_Iu: 4562.52,2939 4550.52,2951 4550.52,2998 4559.52,3007 4749.52,3007 4766.52,2990 4766.52,2941 4669.52,2941 4667.52,2939
  region net GND: 3880.03,3334 3955,3334 3955,3408.97 3880.03,3408.97
  region net V5: 3931,2944 4023.76,2944 4033.76,2934 3927.5,2934 3917.94,2943.56
  region net Vin: 4047.62,2883.62 4056.12,2875.12 4056.12,2737.88 4064.62,2729.38 4073.31,2738.07 4073.31,2875.31 4082,2884
Bottom Layer:
  region net GND: 4735,3104 4755,3124 4806,3124 4892,3038 4892,2713 4738.84,2559.84 4690,2559.84 4690,2670 4696,2670 4794,2768 4794,3006 4735,3065
  region net I1_shunt: 4635,3404 4635,3296 4673,3296 4716,3253 4716,3198.11 4633,3115.11 4633,3039 4698,3039 4698,3104 4765,3171 4795,3171 4795,3353 4747,3353 4696,3404
  region net M1_Iv: 4649,3229 4617,3261 4559.52,3261 4550.52,3252 4550.52,3205 4565.52,3190 4583.52,3190 4695.52,3190 4695.52,3229
  region net M1_Iw: 4645,3470 4617,3442 4562.52,3442 4550.52,3454 4550.52,3501 4559.52,3510 4695.52,3510 4695.52,3470
  region net Vin: 4825.52,3304 4825.52,3352 4869.52,3352 4875.52,3346 4875.52,3289 4875.51,3240 4866.52,3231 4839.52,3231 4820.52,3231 4811.52,3240 4811.52,3290
  region net M1_Iu: 4649,2975 4617,3007 4559.52,3007 4550.52,2998 4550.52,2951 4565.52,2936 4583.52,2936 4695.52,2936 4695.52,2975

## Silkscreen, mask and mechanical layers (free items; w line width, h text height)
Top Overlay:
  lines w5: 4020.89,3559.57 4098.89,3559.57 ; 4059.53,3520.04 4059.53,3598.21 ; 4314.79,3558.06 4392.96,3558.06 ; 4353.43,3519.43 4353.43,3597.43 4353.43,3519.43
  text "W" at 5009,3250 h60
  text "TX" at 3588,3098 h40
  text "GND" at 3689,3098 h40
  text "V" at 5009,3095 h60
  text "U" at 5009,2945 h60
  text "GND" at 3482,2771 h50
  text "VIN" at 3643,2770 h50
  text "YYYY" at 4943,2563 h3
  text "CH32M007E8R6_FAN_R0_1V0" at 4053,2557 h40
Bottom Overlay:
  text "SWIO" at 3562,2800 h40
  text "GND" at 3698,2800 h40
  text "V5" at 3779,2800 h40
Mechanical 1:
  lines w5: 3177.94,2594.97 ccw(c3230.96,2595) 3230.96,2541.99 5243.92,2542 ccw(c5243.92,2595) 5296.94,2595 5296.94,3682.24 ; 3177.94,2595 3177.94,3676.04 cw(c3230.96,3676.04) 3230.96,3729.05 5248.92,3729.05 cw(c5248.92,3681.04) 5296.94,3681.04 ; 3279.38,2655.17 cw(c3338.44,2655.17) 3338.44,2714.23 cw(c3338.44,2655.17) 3397.49,2655.17 cw(c3338.44,2655.17) 3338.44,2596.12 cw(c3338.44,2655.17) 3279.38,2655.17 ; 3279.38,3615.8 cw(c3338.44,3615.8) 3338.44,3674.86 cw(c3338.44,3615.8) 3397.49,3615.8 cw(c3338.44,3615.8) 3338.44,3556.75 cw(c3338.44,3615.8) 3279.38,3615.8 ; 5077.81,2655.17 cw(c5136.86,2655.17) 5136.86,2714.23 cw(c5136.86,2655.17) 5195.92,2655.17 cw(c5136.86,2655.17) 5136.86,2596.12 cw(c5136.86,2655.17) 5077.81,2655.17 ; 5077.81,3615.8 cw(c5136.86,3615.8) 5136.86,3674.86 cw(c5136.86,3615.8) 5195.92,3615.8 cw(c5136.86,3615.8) 5136.86,3556.75 cw(c5136.86,3615.8) 5077.81,3615.8

## Text inside footprints (layer, text, board x,y; h text height)
B1: Bottom Overlay "+" at 3415.93,3183.42 h100 r180